# Altium PCB 2nd pcb.PcbDoc
Units mil, origin at the board's own origin, x right, y up, seen from the top; angles counter-clockwise.
Board outline 354.33 x 590.55 mil, 2 copper layers (Top Layer, Bottom Layer); 9 components, 11 nets, 78 pads, 17 vias.
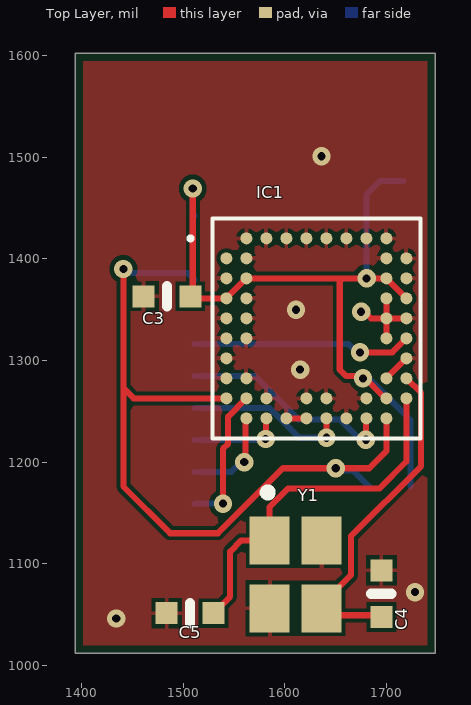
[diagram p0: Top Layer view]
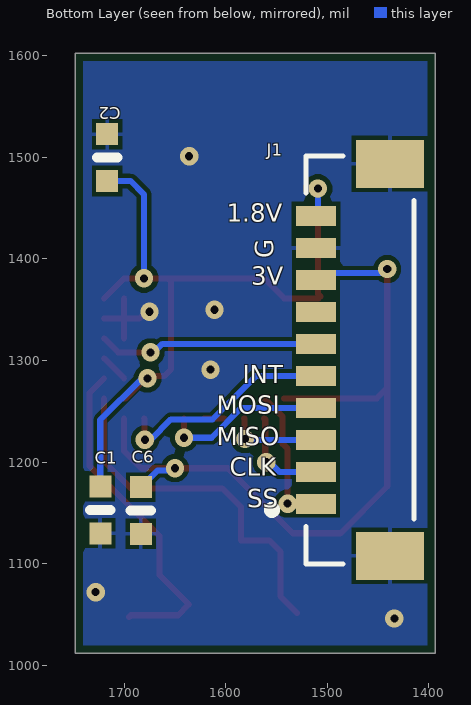
[diagram p1: Bottom Layer view, seen from below]
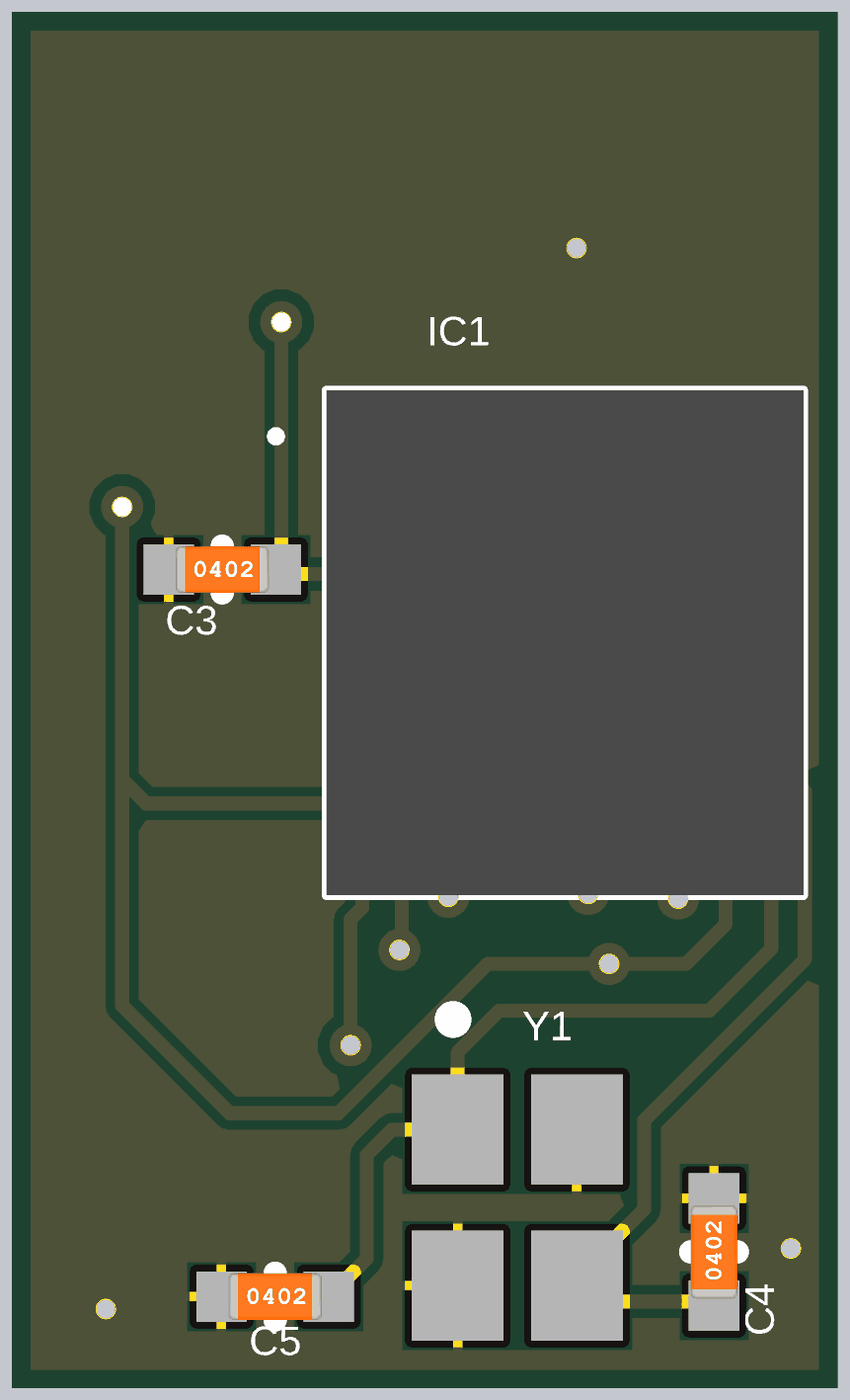
[diagram p2: 3D render of the assembled board from above, using the file's embedded part models]
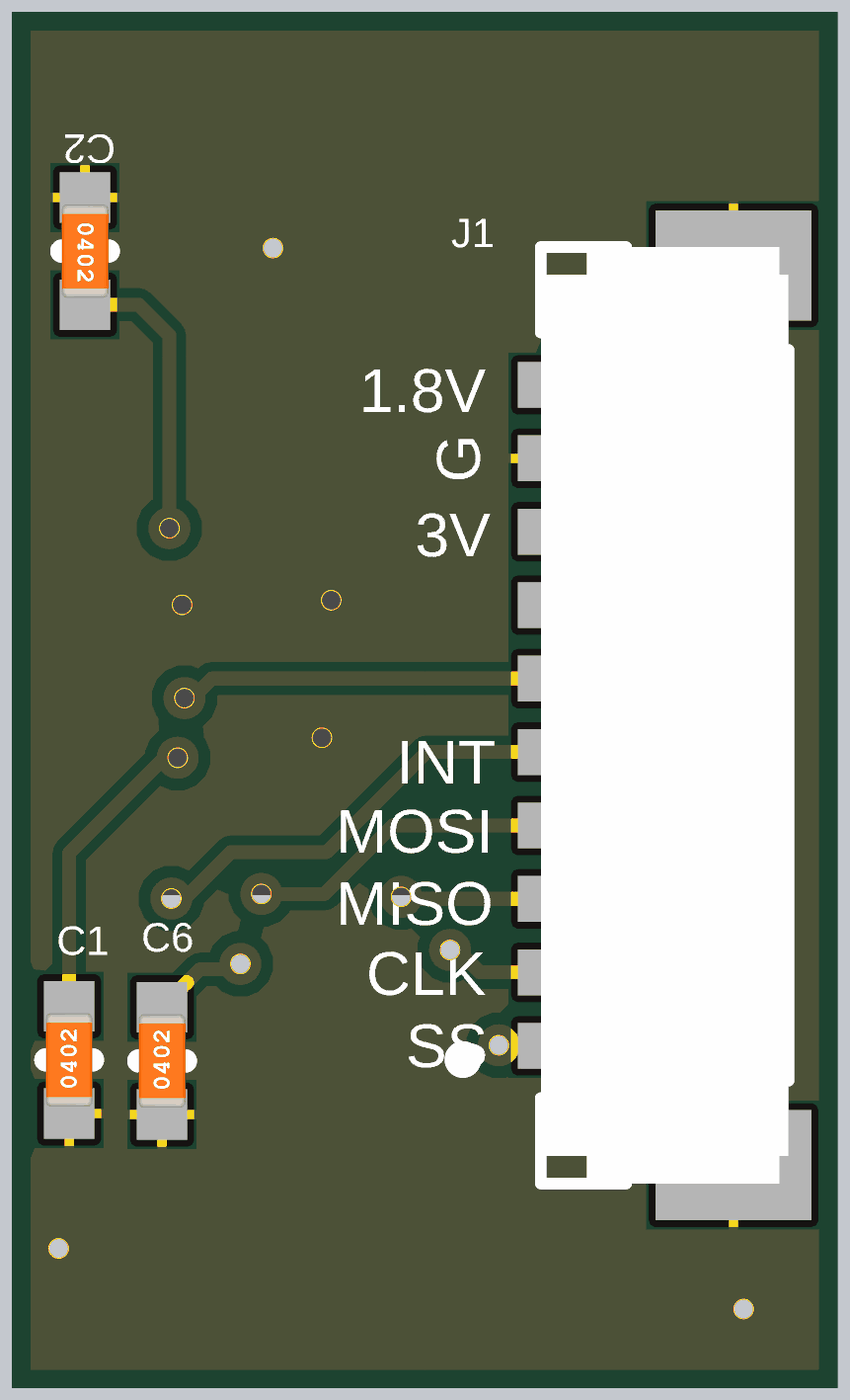
[diagram p3: 3D render of the assembled board from below, using the file's embedded part models]

## Layer stack, top to bottom
Top Solder: solder mask 0.4, Solder Resist, Dk 3.5
Top Layer: signal copper 1.4
Dielectric 1: dielectric 12.6, FR-4, Dk 4.8
Bottom Layer: signal copper 1.4
Bottom Solder: solder mask 0.4, Solder Resist, Dk 3.5

## Board outline
1393.7,1011.81 1393.7,1602.36 1748.03,1602.36 1748.03,1011.81

## Design rules (kind name [scope] priority, off if disabled: settings)
BoardOutlineClearance [All] p1: gap=7.87 ignorepadtopadclearanceinfootprint=FALSE
Clearance [All] p1: gap=4 ignorepadtopadclearanceinfootprint=FALSE except(5: Arc-Via Track-Via SMDPad-Via THPad-Via Via-Via Via-Fill Via-Poly Via-Region Via-Text; 9.84: Arc-Hole Track-Hole SMDPad-Hole THPad-Hole Via-Hole Fill-Hole Poly-Hole Region-Hole Text-Hole)
ComponentClearance [All] p1: gap=4 collisioncheckmode=3 verticalgap=4 showdistances=TRUE
DiffPairsRouting [All] p1: maxlimit=4 minlimit=4 mostfreqgap=4 toplayer_minwidth=4 toplayer_maxwidth=71497.94 toplayer_prefwidth=4 bottomlayer_minwidth=4 bottomlayer_maxwidth=71497.94 bottomlayer_prefwidth=4 maxuncoupledlength=500
Height [All] p1: minheight=0 maxheight=71497.94 prefheight=500
HoleSize [All] p1: absolutevalues=TRUE maxlimit=248.03 minlimit=7.87 maxpercent=80.000 minpercent=20.000
HoleToHoleClearance [All] p1: gap=9.84 allowstackedmicrovias=FALSE
MinimumAnnularRing [All] p1: minimumring=3
MinimumSolderMaskSliver [All] p1: minsoldermaskwidth=0
PlaneClearance [All] p1: clearance=4
PlaneConnect PlaneConnectPowerPads [InPadClass('PowerPads')] p1: planeconnectstyle=Direct reliefexpansion=20 reliefentries=4 reliefconductorwidth=10 reliefairgap=10
PlaneConnect [All] p2: pad.planeconnectstyle=Relief pad.reliefexpansion=11.81 pad.reliefentries=4 pad.reliefconductorwidth=4 pad.reliefairgap=4 via.planeconnectstyle=Direct via.reliefexpansion=11.81 via.reliefentries=4 via.reliefconductorwidth=5 via.reliefairgap=5
PolygonConnect PolygonConnectPowerPads [All vs (InPadClass('PowerPads'))] p1: connectstyle=Direct reliefconductorwidth=10 reliefentries=4 polygonreliefangle="90 Angle" airgapwidth=10
PolygonConnect [All] p2: thpad.connectstyle=Relief thpad.reliefconductorwidth=4 thpad.reliefentries=4 thpad.polygonreliefangle="90 Angle" thpad.airgapwidth=4 smdpad.connectstyle=Relief smdpad.reliefconductorwidth=4 smdpad.reliefentries=4 smdpad.polygonreliefangle="90 Angle" smdpad.airgapwidth=4 via.connectstyle=Direct via.reliefconductorwidth=5 via.reliefentries=4 via.polygonreliefangle="90 Angle" via.airgapwidth=5
RoutingVias [All] p1: holewidth=7.87 width=17.72 viastyle="Through Hole" minholewidth=7.87 minwidth=17.72 maxholewidth=248.03 maxwidth=257.87
SilkToSilkClearance [All] p1: silktosilkclearance=0
SilkToSolderMaskClearance [IsPad] p1: minsilkscreentomaskgap=4 clearancetoexposedcopper=TRUE
SolderMaskExpansion [All] p1: expansion=2.95 istentingtop=FALSE
Width [All] p1: maxlimit=71497.94 minlimit=4 preferedwidth=4
20 further rules are at their usual default settings.

## Classes and differential pairs
component class "radar schematic 2": C1 C3 C4 C5 C6 IC1 J1 Y1

## Components (designator, comment, footprint, x,y, rotation, side; value= is the part's Value field where it differs from the comment)
C1 "1µF" SMD-0402C 1723.47,1152.86 r180 bottom
C2 "1µF" SMD-0402C 1716.65,1499.72 r0 bottom
C3 "1µF" SMD-0402C 1483.94,1363.16 r270 top
C4 "8pF" SMD-0402C 1695.02,1070.51 r0 top
C5 "8pF" SMD-0402C 1506.65,1051.35 r270 top
C6 "1µF" SMD-0402C 1683.6,1152.39 r180 bottom
IC1 "A121-001-T&R" A121001TR 1631.02,1331.69 r0 top
J1 "10144041-10011LF" AMPHENOL_10144041-10011LF 1467.89,1300.63 r90 bottom
Y1 "ECS-240-8-36-RWN-TR3" XTAL_ECS-240-8-36-RWN-TR3 1610.58,1089.47 r270 top

## Footprints (in the part's own frame and the unit in brackets; to place one, negate y for a bottom-side part, rotate by r counter-clockwise, add the part's x,y. Pads: shape width x height; smd on the part's side, far side on the other; paste and mask are expansions set on the pad)
A121001TR [mm]
  round 0.3 smd: A2(-1.75,2.25) A3(-1.25,2.25) A4(-0.75,2.25) A5(-0.25,2.25) A6(0.25,2.25) A7(0.75,2.25) A8(1.25,2.25) A9(1.75,2.25) B1(-2.25,1.75) B2(-1.75,1.75) B9(1.75,1.75) B10(2.25,1.75) C1(-2.25,1.25) C2(-1.75,1.25) C9(1.75,1.25) C10(2.25,1.25) D1(-2.25,0.75) D2(-1.75,0.75) D9(1.75,0.75) D10(2.25,0.75) E1(-2.25,0.25) E2(-1.75,0.25) E9(1.75,0.25) E10(2.25,0.25) F1(-2.25,-0.25) F2(-1.75,-0.25) F9(1.75,-0.25) F10(2.25,-0.25) G1(-2.25,-0.75) G10(2.25,-0.75) H1(-2.25,-1.25) H2(-1.75,-1.25) H9(1.75,-1.25) H10(2.25,-1.25) J1(-2.25,-1.75) J2(-1.75,-1.75) J3(-1.25,-1.75) J5(-0.25,-1.75) J6(0.25,-1.75) J8(1.25,-1.75) J9(1.75,-1.75) J10(2.25,-1.75) K2(-1.75,-2.25) K3(-1.25,-2.25) K4(-0.75,-2.25) K5(-0.25,-2.25) K6(0.25,-2.25) K7(0.75,-2.25) K8(1.25,-2.25) K9(1.75,-2.25)
  silkscreen extent -3.2,-2.75 2.6,2.75, body extent -2.6,-2.75 2.6,2.75, height 0.88
AMPHENOL_10144041-10011LF [mm]
  rect 0.5x1 smd: 1(-3.6,1.1) 2(-2.8,1.1) 3(-2,1.1) 4(-1.2,1.1) 5(-0.4,1.1) 6(0.4,1.1) 7(1.2,1.1) 8(2,1.1) 9(2.8,1.1) 10(3.6,1.1)
  rect 1.2x1.7 smd: S1(-4.9,-0.75) S2(4.9,-0.75)
  silkscreen extent -5.1,-1.35 5.1,2.3, body extent -5.1,-1.35 5.1,1.35, height 1.72
SMD-0402C [mm]
  rect 0.55x0.55 smd: 1(0,0.584) 2(0,-0.584)
  silkscreen extent -0.25,0 0.25,0, body extent -0.25,-0.51 0.25,0.51, height 0.51
XTAL_ECS-240-8-36-RWN-TR3 [mm]
  rect 1.2x1 smd: 1(-0.85,-0.65) 2(0.85,-0.65) 3(0.85,0.65) 4(-0.85,0.65)
  silkscreen extent -2.15,-0.8 -1.95,-0.6

## Part data
C1 C2 C3 C6: library part GCM155C71A105KE38D, "CAP CER 1UF 10V X7S 0402", Digi-Key Part Number=490-13409-1-ND, Manufacturer="Murata Electronics North America", Operating Temperature="-55°C ~ 125°C", Package / Case="0402 (1005 Metric)", Ratings=AEC-Q200, Temperature Coefficient=X7S, Tolerance=±10%, Voltage=10V, @ qty=0, Applications=Automotive, Datasheets=http://www.murata.com/~/media/webrenewal/support/library/catalog/products/capacitor/mlcc/c03e.ashx, Factory Stock=0, Features=-, Height - Seated (Max)=-, Image=//media.digikey.com/Renders/Murata%20Renders/ZRB-SERIES-0402.jpg, Lead Spacing=-, Lead Style=-, Minimum Quantity=1, Mounting Type="Surface Mount, MLCC", Packaging="Cut Tape (CT)", Part Number=GCM155C71A105KE38D, Part Status=Active, Quantity Available=7240, Series=GCM, Size / Dimension="0.039\" L x 0.020\" W (1.00mm x 0.50mm)", Thickness (Max)="0.022\" (0.55mm)", Unit Price (USD)=0.12
C4 C5: library part GRM1555C1H8R0BA01D, "CAP CER 8PF 50V NP0 0402", Digi-Key Part Number=490-8230-1-ND, Manufacturer="Murata Electronics North America", Operating Temperature="-55°C ~ 125°C", Package / Case="0402 (1005 Metric)", Ratings=-, Temperature Coefficient="C0G, NP0", Tolerance=±0.1pF, Voltage=50V, @ qty=0, Applications="General Purpose", Datasheets=http://www.murata.com/~/media/webrenewal/support/library/catalog/products/capacitor/mlcc/c02e.pdf, Factory Stock=0, Features=-, Height - Seated (Max)=-, Image=//media.digikey.com/Renders/Murata%20Renders/ZRB-SERIES-0402.jpg, Lead Spacing=-, Lead Style=-, Minimum Quantity=1, Mounting Type="Surface Mount, MLCC", Packaging="Cut Tape (CT)", Part Number=GRM1555C1H8R0BA01D, Part Status=Active, Quantity Available=3665, Series=GRM, Size / Dimension="0.039\" L x 0.020\" W (1.00mm x 0.50mm)", Thickness (Max)="0.022\" (0.55mm)", Unit Price (USD)=0.1
IC1: "Integrated Circuit", Manufacturer_Name="Acconeer AB", Mouser Part Number=925-A121-001-T&R, Datasheet Link=https://gr.mouser.com/datasheet/2/1126/A121_datasheet-3133196.pdf, Height=0.899mm, Manufacturer_Part_Number=A121-001-T&R, Mouser Price/Stock=https://www.mouser.co.uk/ProductDetail/Acconeer/A121-001-TR?qs=amGC7iS6iy%2F9krRiPHmNkQ%3D%3D
J1 Y1: Package=None, Availability=Unavailable, Price=None
  J1: MF="{'manufacturer': u'Amphenol ICC (FCI)'}", MP=10144041-10011LF
  Y1: MF="{'manufacturer': u'ECS Inc.'}", MP=ECS-240-8-36-RWN-TR3

## Via types
v1: diameter 18, hole 8, Top Layer to Bottom Layer, tented both sides, 17 vias

## Nets (pads, with @x,y where several pads share a name; then routed paths per layer and width w, separated by ;. In a path a pad name is that pad's centre, name@x,y a point inside that pad or via, vN(x,y) a via of type N, cw(c..) or ccw(c..) an arc to the next point about the centre after c; other vN are vias at no path point)
3.3V: C6.1 IC1.J1 IC1.K9 J1.8 | length 779.3
  Top Layer w6: v1(1441,1390) 1441,1273 ; IC1.J1 1451.2,1262.8 1441,1273 ; IC1.K9 1699.92,1210.92 1683,1194 v1(1650,1194) 1598,1194 1534,1130 1487,1130 1441,1176 1441,1273
  Bottom Layer w6: v1(1441,1390) 1444.25,1390 1448.03,1386.21 1504.35,1386.21 J1.8 ; v1(1650,1194) 1652.3,1191.7 1667.28,1191.7 C6.1
+1.8V: C1.1 C2.1 C3.1 IC1.C2 IC1.C9 IC1.D1 IC1.D10 IC1.J9 J1.10 | length 767.1
  Top Layer w6: v1(1509.3,1469.25) 1509.3,1365.52 C3.1 1508.87,1361.22 IC1.D1 IC1.C2 1657,1380.9 ; v1(1680.46,1380.89) 1657,1380.9 ; v1(1680.46,1380.89) IC1.C9 IC1.D10 ; IC1.J9 1698.49,1262.8 1678.86,1282.42 v1(1676.92,1282.42) 1674.62,1284.72 1660.28,1284.72 1654,1291 1654,1377.9 1657,1380.9
  Bottom Layer w6: v1(1509.3,1469.25) 1509.3,1444.26 J1.10 ; v1(1676.92,1282.42) 1676.92,1281.82 1677.04,1281.7 1683.3,1281.7 1723.47,1241.53 C1.1 ; v1(1680.46,1380.89) 1680.46,1463.46 1693.72,1476.72 C2.1
ENABLE_RADAR: IC1.F10 J1.6 | length 217.6
  Top Layer w6: v1(1674,1308) 1705.76,1308 IC1.F10
  Bottom Layer w6: J1.6 1662.37,1316.38 1670.75,1308 v1(1674,1308)
GND: C1.2 C2.2 C3.2 C4.1 C5.2 C6.2 IC1.A2 IC1.A3 IC1.A4 IC1.A5 IC1.A6 IC1.A7 IC1.A8 IC1.A9 IC1.B2 IC1.B9 IC1.B10 IC1.C1 IC1.C10 IC1.D2 IC1.D9 IC1.E1 IC1.E2 IC1.E9 IC1.E10 IC1.F1 IC1.F2 IC1.F9 IC1.G1 IC1.G10 IC1.H1 IC1.H2 IC1.H9 IC1.J3 IC1.J5 IC1.J6 IC1.J8 IC1.K4 IC1.K5 IC1.K7 J1.9 J1.S1 J1.S2 Y1.2 Y1.4 | length 134.2
  Top Layer w6: IC1.K4 IC1.K5 ; v1(1675,1348) 1678.25,1348 1684.71,1341.54 IC1.E9 ; IC1.H9 IC1.G10 ; IC1.F9 IC1.E9 ; IC1.D9 IC1.E9 ; IC1.E10 IC1.E9
  other v1: 1434,1046 1728,1072 1615,1291 1611,1350 1636,1501
INTERRUPT: IC1.K8 J1.5 | length 215.8
  Top Layer w6: v1(1679.63,1222.05) 1679.93,1222.35 1679.93,1242.81 IC1.K8
  Bottom Layer w6: J1.5 1570.12,1284.88 1613,1242 1654,1242 1673.95,1222.05 v1(1679.63,1222.05)
NetC4_2: C4.2 IC1.H10 Y1.3 | length 333
  Top Layer w6: C4.2 1693.29,1049.24 1646.87,1049.24 1636.17,1059.94 1665,1088.78 1665,1127 1734,1196 1734,1268.09 IC1.H10
NetC5_1: C5.1 IC1.J10 Y1.1 | length 359.3
  Top Layer w6: C5.1 1546,1067.69 1546,1112 1556.94,1122.94 Y1.1 1584.98,1155.98 1603,1174 1693,1174 1719.61,1200.61 IC1.J10
SPI_CLK: IC1.K2 J1.2 | length 96.8
  Top Layer w6: v1(1560,1200) 1561.06,1201.06 1561.06,1242.05 IC1.K2
  Bottom Layer w6: J1.2 1547.15,1190.39 1556.75,1200 v1(1560,1200)
SPI_MISO: IC1.K3 J1.3 | length 90.9
  Top Layer w6: v1(1581.01,1222.76) 1581.41,1223.16 1581.41,1242.71 IC1.K3
  Bottom Layer w6: J1.3 1580.14,1221.89 v1(1581.01,1222.76)
SPI_MOSI: IC1.K6 J1.4 | length 161.1
  Top Layer w6: IC1.K6 1640.93,1243.04 1640.93,1224.07 v1(1641,1224)
  Bottom Layer w6: J1.4 1584.61,1253.39 1614,1224 v1(1641,1224)
SPI_SS: IC1.J2 J1.1 | length 141.3
  Top Layer w6: v1(1539.07,1159.11) 1539,1159.18 1539,1213 1544,1218 1544,1244.67 IC1.J2
  Bottom Layer w6: J1.1 1511.41,1159.11 v1(1539.07,1159.11)
pads on no net: IC1.B1 J1.7

## Polygon pours and split planes (outlines as drawn)
GND on Bottom Layer "GND_L02_P001" (solid, pour order 1): 1393.7,1011.81 1393.7,1602.36 1748.03,1602.36 1748.03,1011.81
GND on Top Layer "GND_L01_P000" (solid, pour order 0): 1393.7,1011.81 1393.7,1602.36 1748.03,1602.36 1748.03,1011.81

## Silkscreen, mask and mechanical layers (free items; w line width, h text height)
Bottom Overlay:
  text "1.8V" at 1599.02,1430.79 h30
  text "G" at 1547.33,1400.48 h30 r270
  text "3V" at 1575.02,1368.81 h30
  text "INT" at 1583.02,1271.48 h30
  text "MOSI" at 1609.02,1241.79 h30
  text "MISO" at 1609.02,1210.79 h30
  text "CLK" at 1596.02,1180.79 h30
  text "SS" at 1579.02,1149.79 h30
Mechanical 1:
  the board outline again, w1